# Altium PCB DIO_8SMA_8MCX_MEZZ.PcbDoc (part 3 of 4)
Units mm, origin at the board's own origin, x right, y up, seen from the top; angles counter-clockwise.
Board outline 143 x 98.9 mm, 4 copper layers (Top Layer, Layer 1, Layer 2, Bottom Layer), stack 1.57 mm thick; 303 components, 168 nets, 944 pads, 487 vias.
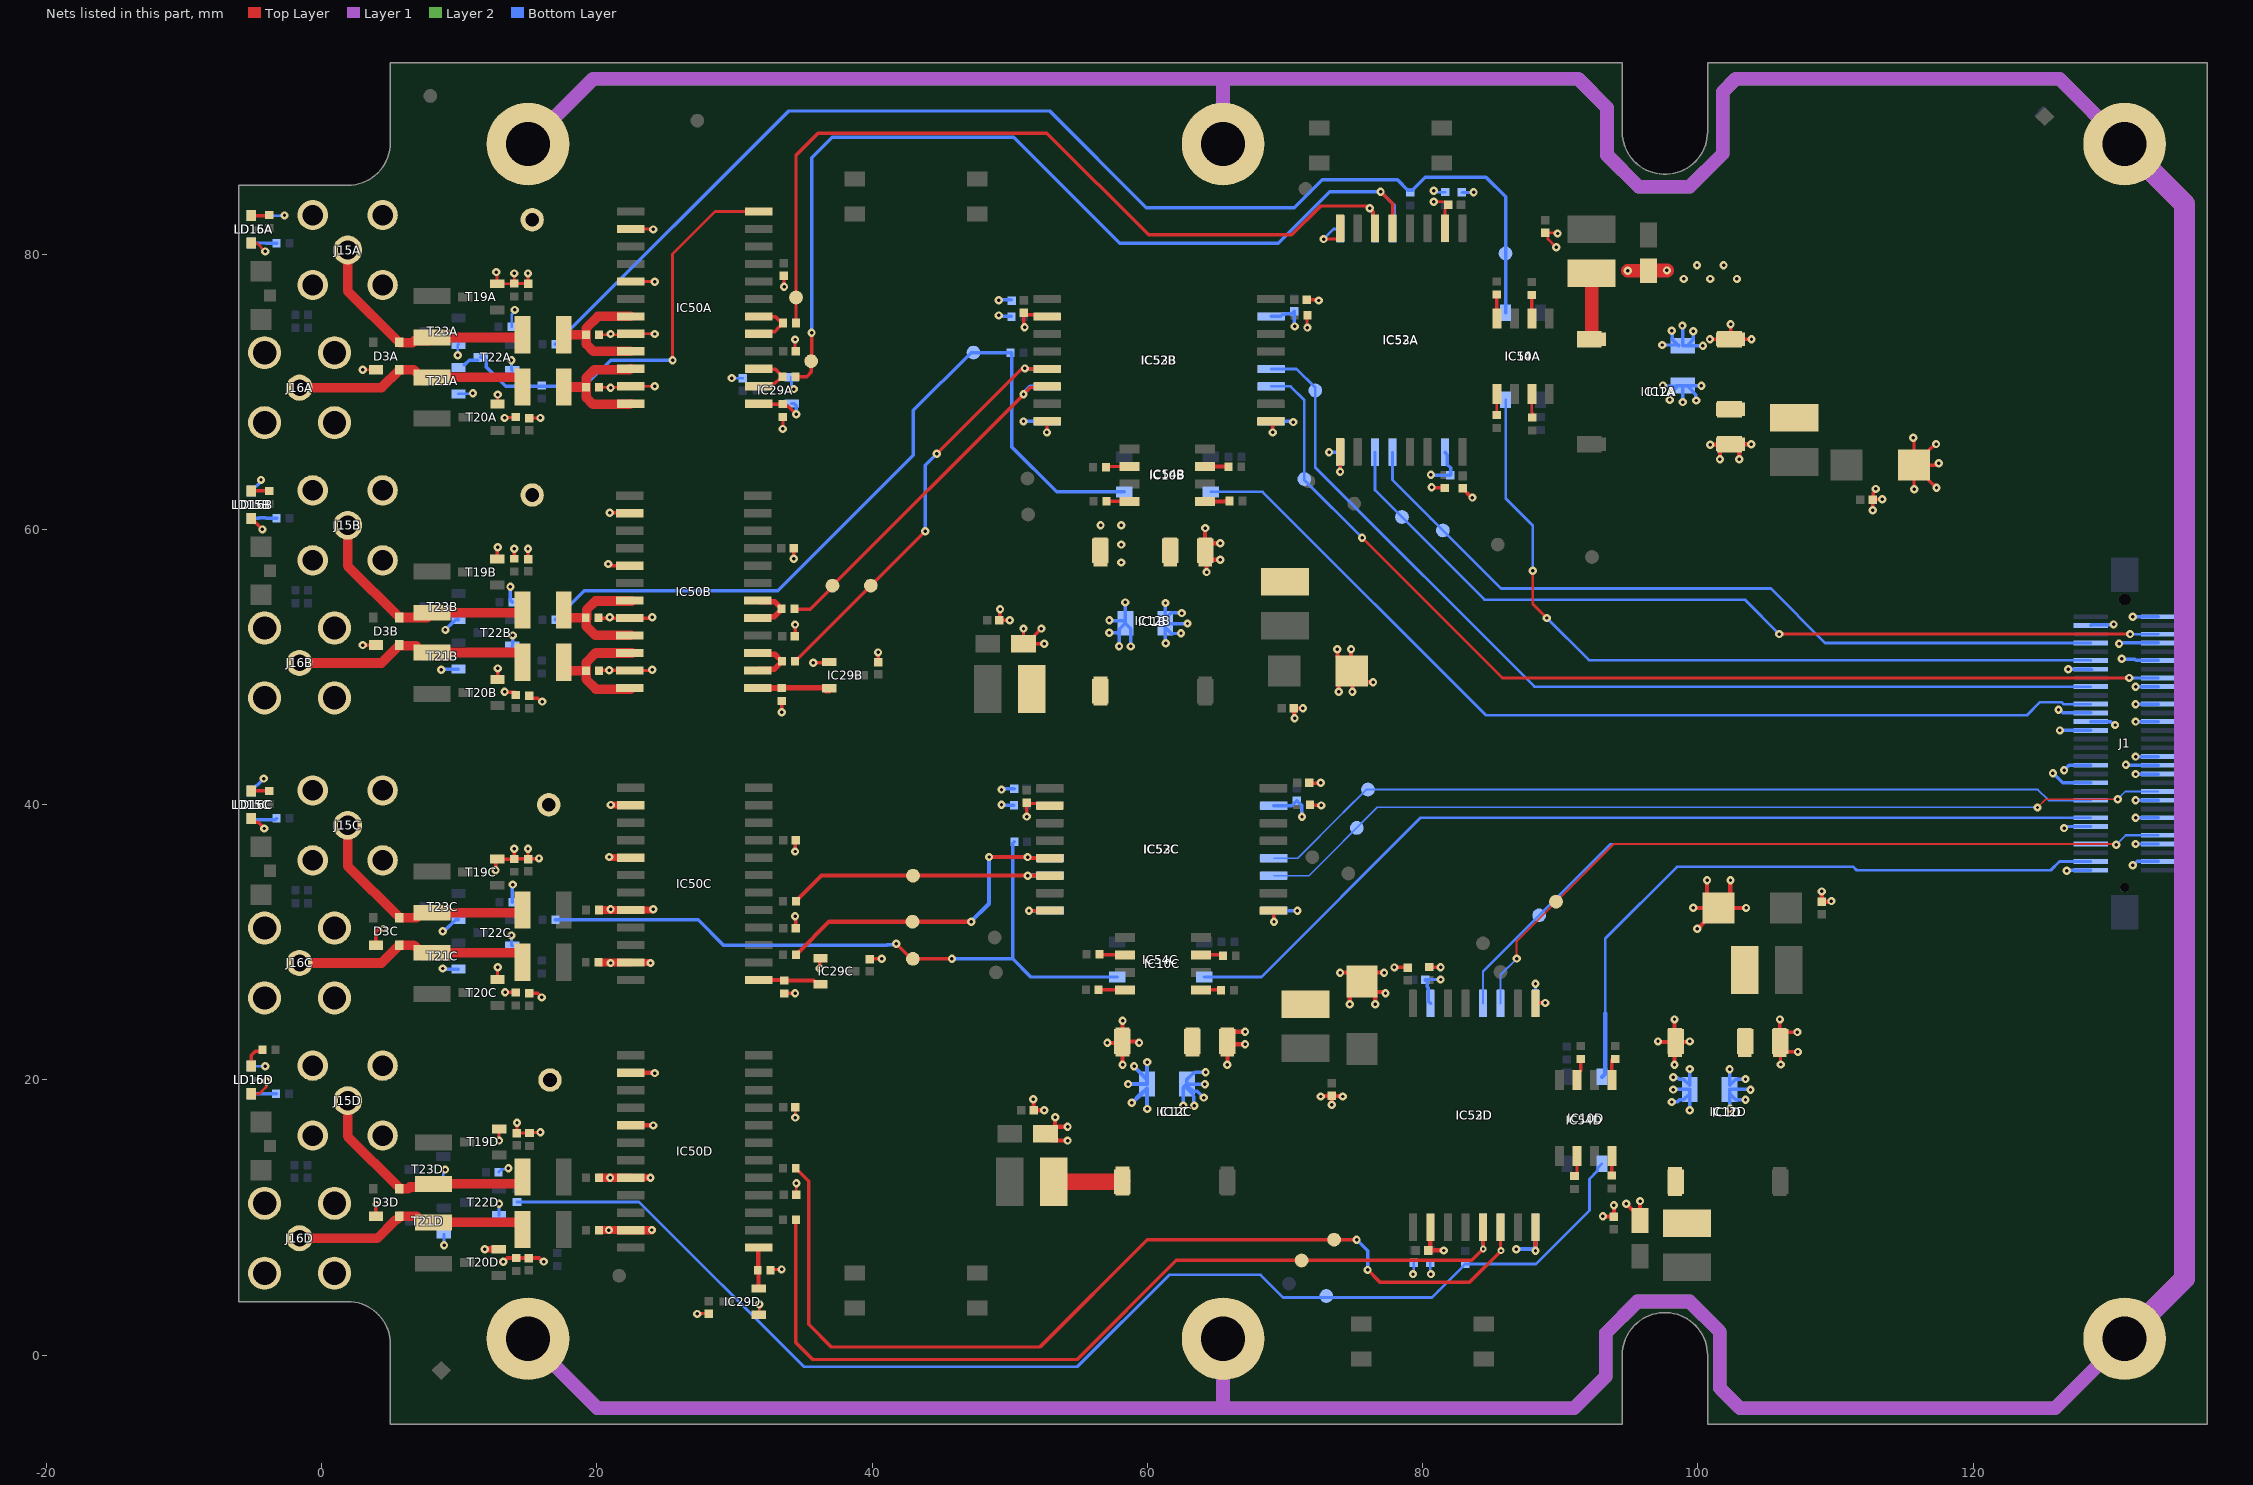
[diagram p4: the nets of this part, all layers, seen from the top]

## Via types
v1: diameter 0.6, hole 0.25, Top Layer to Bottom Layer, tented both sides, 472 vias
v2: diameter 0.5, hole 0.25, Top Layer to Bottom Layer, tented both sides, 8 vias
v3: diameter 0.5, hole 0.2, Top Layer to Bottom Layer, tented both sides, 7 vias

## Nets (pads, with @x,y where several pads share a name; then routed paths per layer and width w, separated by ;. In a path a pad name is that pad's centre, name@x,y a point inside that pad or via, vN(x,y) a via of type N, cw(c..) or ccw(c..) an arc to the next point about the centre after c; other vN are vias at no path point) (continued)
NetIC10D_3: (continued)
  Top Layer w0.25: IC10D.3@91.215,19.982 91.215,20.382 91.5,20.668 R29D.1@91.5,21.53
NetIC10D_6: IC10D.6 R87D.2 | length 1.5
  Top Layer w0.25: IC10D.6@91.215,14.482 91.215,13.006 R87D.2@91.225,12.996
NetIC10D_8: IC10D.8 R88D.2 | length 1.5
  Top Layer w0.25: R88D.2@93.75,13.002 93.755,13.007 IC10D.8@93.755,14.482
NetIC29A_2: IC29A.2 IC50A.13 R202A.2 | length 4.2
  Top Layer w0.25: IC50A.13@31.75,69.13 31.771,69.109 R202A.2@33.496,69.109 ; R202A.2@33.571,69.035 R202A.2@33.496,69.11 33.661,68.945 33.904,68.945 v1(34.486,68.363)
  Bottom Layer w0.25: IC29A.2@34.15,69.15 34.3,69.15 34.475,68.975 34.475,68.374 v1(34.486,68.363)
NetIC29B_2: IC29B.2 IC50B.13 R202B.2 | length 5.3
  Top Layer w0.4: IC50B.13@31.681,48.48 33.426,48.48 33.431,48.485 36.436,48.485 36.656,48.265 IC29B.2@36.881,48.265
NetIC29C_2: IC29C.2 IC50C.13 R202C.2 | length 4.6
  Top Layer w0.3: IC50C.13@31.75,27.265 33.575,27.265 R202C.2@33.6,27.24 35.735,27.24 36.025,26.95 IC29C.2@36.25,26.95
NetIC29D_2: IC29D.2 IC50D.13 R202D.2 | length 3
  Top Layer w0.3: IC50D.13@31.747,7.821 31.73,7.805 31.73,6.2 31.75,6.18 IC29D.2@31.75,4.85
NetIC50A_7: IC50A.7 IC50A.9 R203A.2 R206A.2 | length 9.8
  Top Layer w0.7: R203A.2@17.6,74.15 17.605,74.145 R206A.2@19.23,74.145 ; IC50A.9@22.45,72.94 19.76,72.94 19.23,73.47 R206A.2@19.23,74.145 ; IC50A.7@22.45,75.48 20.08,75.48 19.23,74.63 R206A.2@19.23,74.145
NetIC50A_10: IC50A.10 IC50A.12 R208A.2 R210A.2 | length 10
  Top Layer w0.7: R208A.2@17.6,70.35 19.215,70.35 R210A.2@19.23,70.335 ; IC50A.12@22.45,69.13 22.42,69.1 19.7,69.1 19.23,69.57 R210A.2@19.23,70.335 ; IC50A.10@22.45,71.67 22.38,71.6 19.8,71.6 19.23,71.03 R210A.2@19.23,70.335
NetIC50A_14: IC50A.14 IC50A.15 R204A.1 | length 4
  Top Layer w0.25: IC50A.14@31.75,70.4 31.925,70.575 32.897,70.575 33.275,70.953 33.315,70.953 33.48,71.118 33.48,71.158 33.315,71.323 33.295,71.323 32.979,71.64 31.78,71.64 IC50A.15@31.75,71.67
NetIC50A_17: IC50A.17 IC50A.18 R205A.1 | length 4
  Top Layer w0.25: IC50A.17@31.75,74.21 31.914,74.374 32.916,74.374 33.295,74.753 33.315,74.753 33.48,74.918 33.48,74.938 33.48,74.958 33.315,75.123 33.295,75.123 32.979,75.44 31.79,75.44 IC50A.18@31.75,75.48
NetIC50A_24: IC50A.24 R220A.1 T21A.1 T22A.3 | length 32.3
  Top Layer w0.2: v1(25.5,72.3) 25.5,80 28.6,83.1 IC50A.24@31.75,83.1
  Bottom Layer w0.25: T21A.1@10.363,71.95 10.717,72.304 T22A.3@11.354,72.304 ; T22A.3@11.55,72.5 11.75,72.5 11.95,72.3 11.95,71.835 13.385,70.4 16,70.4 19.1,70.4 21,72.3 v1(25.5,72.3)
NetIC50B_7: IC50B.7 IC50B.9 R203B.2 R206B.2 | length 10.3
  Top Layer w0.7: R203B.2@17.6,54.15 17.6,53.809 17.825,53.584 R206B.2@19.181,53.584 ; R206B.2@19.194,53.571 19.236,53.529 19.236,52.964 19.9,52.3 IC50B.9@22.509,52.3 ; R206B.2@19.267,53.533 19.267,54.167 19.9,54.8 IC50B.7@22.526,54.8
NetIC50B_10: IC50B.10 IC50B.12 R208B.2 R210B.2 | length 10.5
  Top Layer w0.7: R208B.2@17.6,50.35 17.6,49.955 17.825,49.73 R210B.2@19.21,49.73 ; IC50B.12@22.467,48.4 19.941,48.4 19.23,49.111 19.23,49.8 19.23,50.335 19.915,51.02 IC50B.10@22.563,51.02
NetIC50B_14: IC50B.14 IC50B.15 R204B.1 | length 4.1
  Top Layer w0.4: IC50B.14@31.681,49.75 31.781,49.85 32.897,49.85 33.351,50.305 33.371,50.305 33.461,50.395 R204B.1@33.461,50.415 33.461,50.435 33.371,50.525 33.351,50.525 32.943,50.933 31.768,50.933 IC50B.15@31.681,51.02
NetIC50B_17: IC50B.17 IC50B.18 R205B.1 | length 4.1
  Top Layer w0.4: IC50B.17@31.681,53.56 31.781,53.66 32.907,53.66 33.351,54.105 33.371,54.105 33.461,54.195 33.461,54.215 33.461,54.235 33.371,54.325 33.351,54.325 32.938,54.738 31.773,54.738 IC50B.18@31.681,54.83